# Altium PCB Slave.PcbDoc
Units mm, origin at the board's own origin, x right, y up, seen from the top; angles counter-clockwise.
Board outline 50.37 x 67.75 mm, 2 copper layers (Top Layer, Bottom Layer); 18 components, 16 nets, 92 pads, 0 vias.
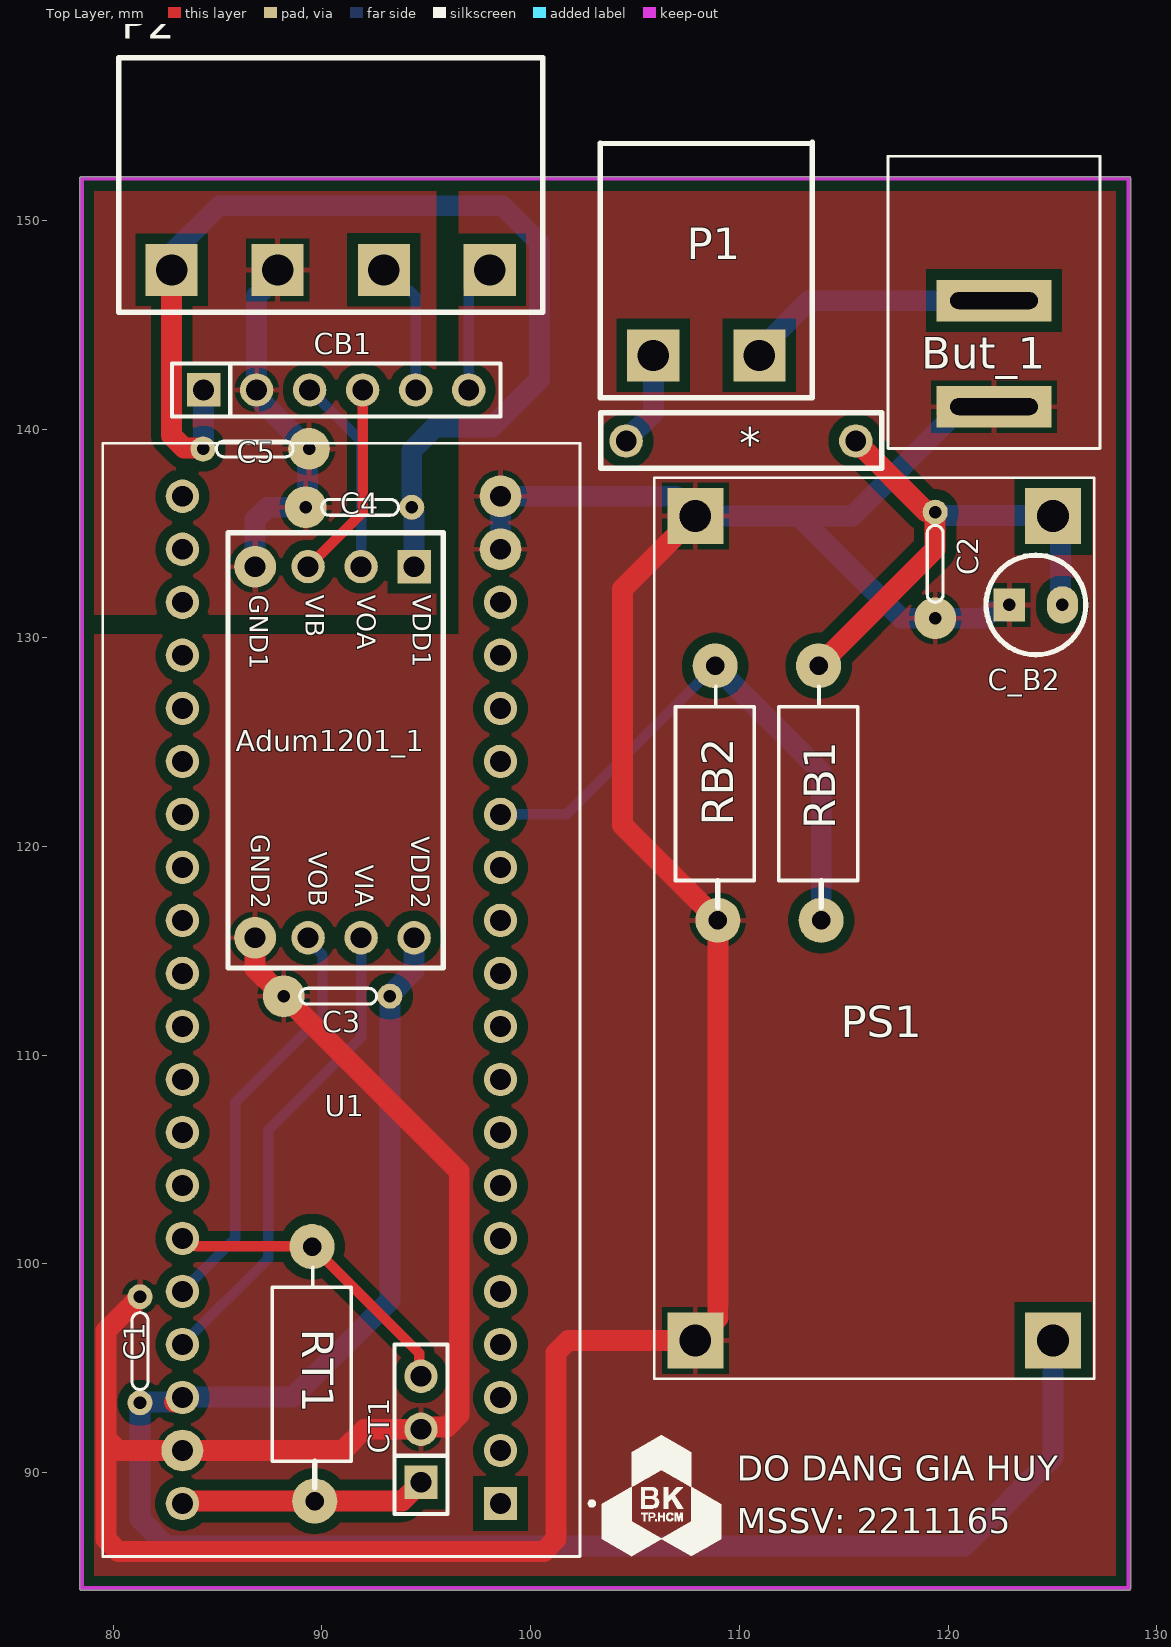
[diagram p0: Top Layer view]
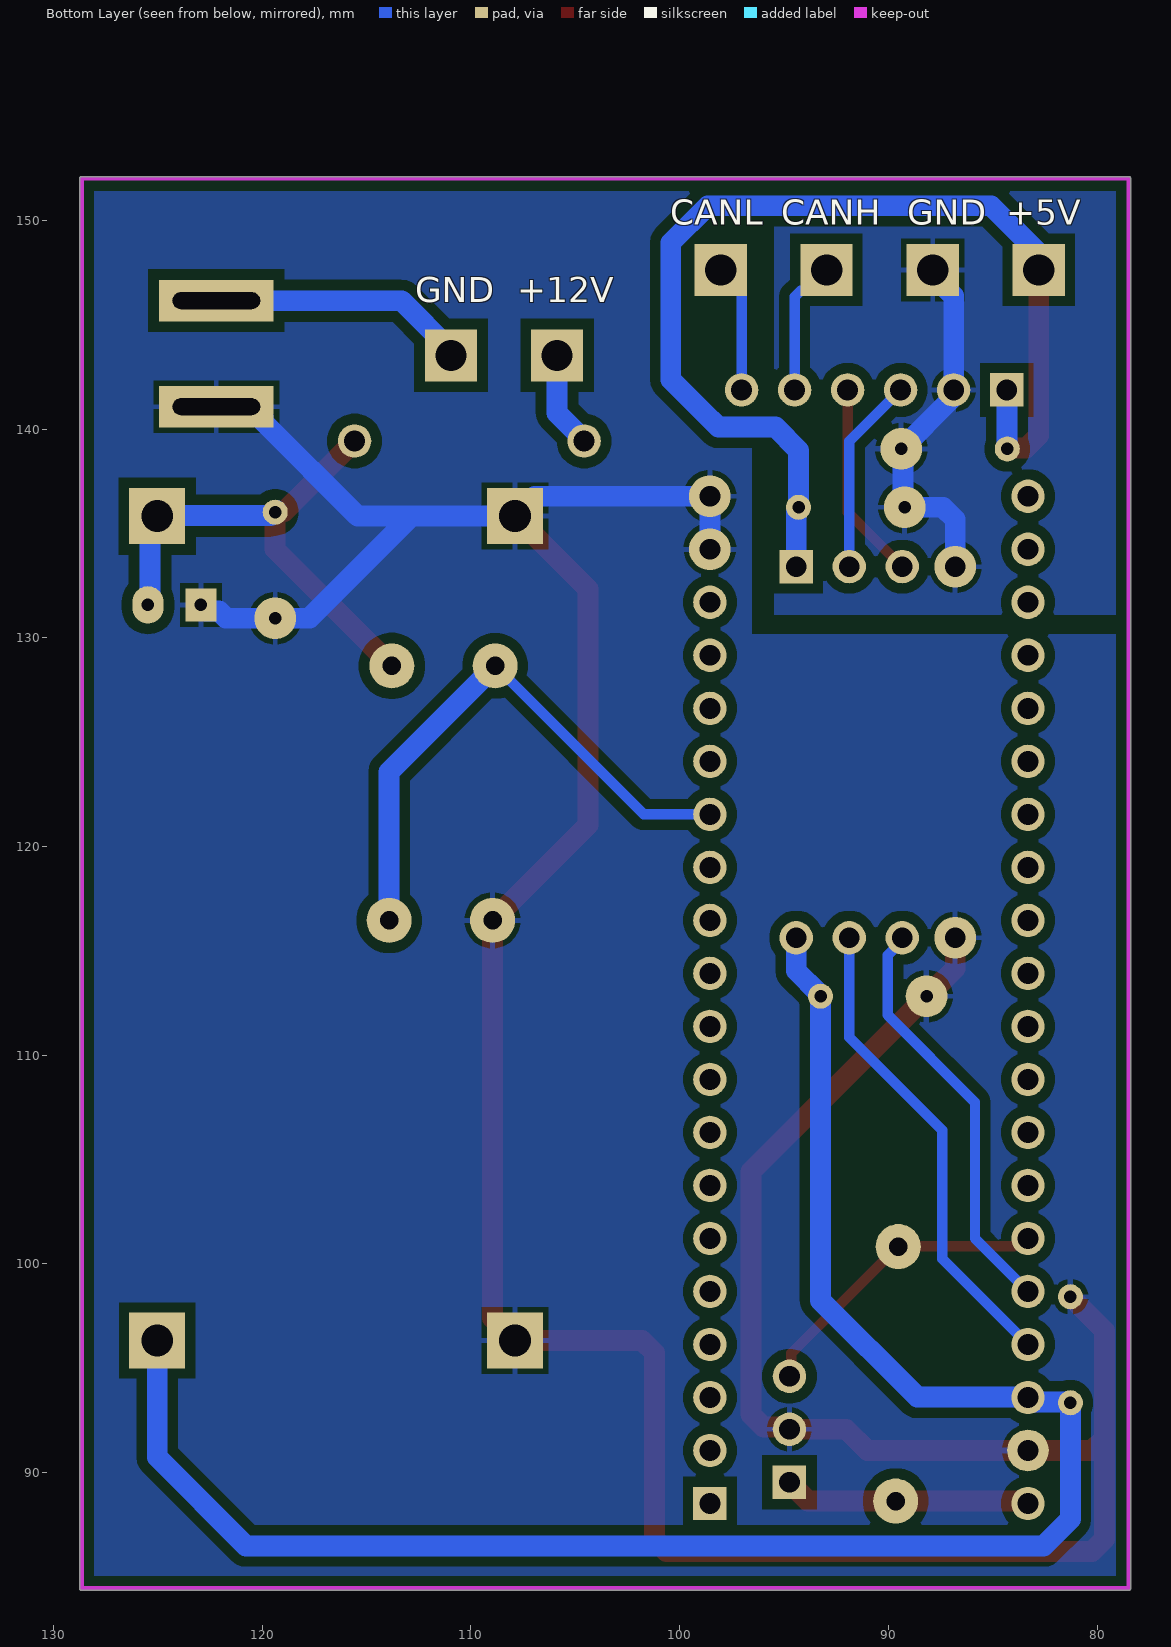
[diagram p1: Bottom Layer view, seen from below]

## Layer stack, top to bottom
Top Solder: solder mask 0.0102, Solder Resist, Dk 3.5
Top Layer: signal copper 0.0356
Dielectric 1: dielectric 0.32, FR-4, Dk 4.8
Bottom Layer: signal copper 0.0356
Bottom Solder: solder mask 0.0102, Solder Resist, Dk 3.5

## Board outline
78.386,84.455 78.386,152 cw(c78.486,152) 78.486,152.1 128.651,152.1 cw(c128.651,152) 128.751,152 128.751,84.455 cw(c128.651,84.455) 128.651,84.355 78.486,84.355 cw(c78.486,84.455)

## Design rules (kind name [scope] priority, off if disabled: settings)
Clearance Clearance_Polygon [InPolygon] p1: gap=0.5 ignorepadtopadclearanceinfootprint=FALSE
Clearance [All] p2: gap=0.3 ignorepadtopadclearanceinfootprint=FALSE
ComponentClearance [All] p1: gap=0 collisioncheckmode=3 verticalgap=0 showdistances=FALSE
PlaneClearance [All] p1: clearance=0.5
PlaneConnect [All] p1: planeconnectstyle=Direct reliefexpansion=0.508 reliefentries=4 reliefconductorwidth=0.254 reliefairgap=0.254
PolygonConnect [All] p1: connectstyle=Relief reliefconductorwidth=0.254 reliefentries=4 polygonreliefangle="90 Angle" airgapwidth=0.254
RoutingVias [All] p1: holewidth=0.711 width=1.27 viastyle="Through Hole" minholewidth=0.711 minwidth=1.27 maxholewidth=0.711 maxwidth=1.27
SolderMaskExpansion [All] p1: expansion=0.102 istentingtop=FALSE
Width power [InNetClass('Pwer')] p1: maxlimit=1.5 minlimit=0.5 preferedwidth=1
Width [All] p2: maxlimit=1 minlimit=0.3 preferedwidth=0.5
27 further rules are at their usual default settings.

## Components (designator, comment, footprint, x,y, rotation, side; value= is the part's Value field where it differs from the comment)
* "Component_1" fuse 104.575,139.425 r0 top
Adum1201_1 "Adum1201_1" Adum1201 94.415,133.405 r270 top (schematic designator *1)
But_1 "Button" Button 122.2,141.07 r180 top
C1 "Capacitor Ceramic" Tu-ceramic#1 81.28,93.345 r90 top value=100nF
C2 "Capacitor Ceramic" Tu-ceramic#2 119.38,136.017 r270 top value=100nF
C3 "Capacitor Ceramic" Tu-ceramic#2 93.25,112.825 r180 top value=100nF
C4 "Capacitor Ceramic" Tu-ceramic#2 94.3,136.25 r180 top value=100nF
C5 "Capacitor Ceramic" Tu-ceramic#2 84.3,139.05 r0 top value=100nF
C_B2 "22 mF - 100mF" CA-ALU-2.54 124.206,131.572 r0 top value=104
CB1 "JP6" JP6-C1T 84.33,141.875 r0 top
CT1 "JP3" JP3-C1T 94.742,89.535 r90 top
P1 "BIG_Header 1" "BIG_Header 2" 105.875,143.525 r0 top
P2 "BIG Header 4" "BIG_Header 4" 82.795,147.625 r0 top
PS1 "MC00100" CONV_MC00100 116.459,116.078 r270 top
RB1 "33k" RES-1/2W 113.792,122.047 r90 top
RB2 "9.1k" RES-1/2W 108.839,122.047 r90 top
RT1 "4K7" RES-1/2W 89.525,94.225 r90 top
U1 "ZC323000" MODULE_ZC323000 90.932,112.649 r180 top

## Footprints (in the part's own frame and the unit in brackets; to place one, negate y for a bottom-side part, rotate by r counter-clockwise, add the part's x,y. Pads: shape width x height; smd on the part's side, far side on the other; paste and mask are expansions set on the pad)
Adum1201 [mm]
  rect 1.6x1.6 hole 1: 1(0,0)
  round 1.6 hole 1: 2(0,-2.54) 3(0,-5.08) 5(17.78,0) 6(17.78,-2.54) 7(17.78,-5.08)
  round 2 hole 1: 4(0,-7.62) 8(17.78,-7.62)
  silkscreen extent -1.63,-8.92 19.23,1.4
"BIG_Header 2" [mm]
  rect 2.5x2.5 hole 1.5: 1(0,0) 2(5.08,0)
  silkscreen extent -2.54,-2.03 7.62,10.21, body extent -2.5,-1.75 7.58,10.25, height 3.15
"BIG_Header 4" [mm]
  rect 2.5x2.5 hole 1.5: 1(0,0) 2(5.08,0) 3(10.173,0) 4(15.24,0)
  rect 2x2.5 hole 1.5: 1(0,0) 2(5.08,0) 3(10.16,0)
  silkscreen extent -2.54,-2.03 17.78,10.17, body extent -2.5,-1.75 17.74,10.25, height 3.15
Button [mm]
  rect 5.5x2 hole 0.8 slot 4.2 at 0 deg: 1(0,0) 2(0,-5.08)
  silkscreen extent -5.08,-12 5.08,2
CA-ALU-2.54 [mm]
  rect 1.5x1.58 hole 0.6: 1(-1.27,0)
  oval 1.5x1.8 hole 0.6: 2(1.27,0)
  silkscreen extent -2.39,-2.39 2.39,2.39, body extent -2,-2.03 1.99,1.97, height 7.01
CONV_MC00100 [mil]
  rect 105.63x105.63 / inner round 105.63 / far side rect 105.63x105.63 hole 60 mask+4.02: IN+(-777.5,337.5) IN-(-777.5,-337.5) OUT+(777.5,337.5) OUT-(777.5,-337.5)
  silkscreen extent -850,-415 850,415, body extent -850,-415 850,415, height 551
fuse [mm]
  round 1.6 hole 1: 1(0,0) 2(11,0)
  silkscreen extent -1.22,-1.3 12.25,1.35
JP3-C1T [mm] "3 row, straight, gold plating"
  rect 1.6x1.6 hole 1: 1(0,0)
  round 1.6 hole 1: 2(2.54,0) 3(5.08,0)
  silkscreen extent -1.52,-1.27 6.6,1.27, body extent -1.52,-1.25 6.6,1.25, height 8.51
JP6-C1T [mm] "6 row, straight, gold plating"
  rect 1.6x1.6 hole 1: 1(0,0)
  round 1.6 hole 1: 2(2.54,0) 3(5.08,0) 4(7.62,0) 5(10.16,0) 6(12.7,0)
  silkscreen extent -1.52,-1.27 14.22,1.27, body extent -1.52,-1.25 14.22,1.25, height 8.51
MODULE_ZC323000 [mm]
  rect 1.6x1.6 hole 1: 1(-7.62,24.13)
  round 1.6 hole 1: 2(-7.62,21.59) 3(-7.62,19.05) 4(-7.62,16.51) 5(-7.62,13.97) 6(-7.62,11.43) 7(-7.62,8.89) 8(-7.62,6.35) 9(-7.62,3.81) 10(-7.62,1.27) 11(-7.62,-1.27) 12(-7.62,-3.81) 13(-7.62,-6.35) 14(-7.62,-8.89) 15(-7.62,-11.43) 16(-7.62,-13.97) 17(-7.62,-16.51) 18(-7.62,-19.05) 21(7.62,-24.13) 22(7.62,-21.59) 23(7.62,-19.05) 24(7.62,-16.51) 25(7.62,-13.97) 26(7.62,-11.43) 27(7.62,-8.89) 28(7.62,-6.35) 29(7.62,-3.81) 30(7.62,-1.27) 31(7.62,1.27) 32(7.62,3.81) 33(7.62,6.35) 34(7.62,8.89) 35(7.62,11.43) 36(7.62,13.97) 37(7.62,16.51) 38(7.62,19.05) 40(7.62,24.13)
  round 2 hole 1: 19(-7.62,-21.59) 20(-7.62,-24.13) 39(7.62,21.59)
  silkscreen extent -12.1,-26.67 11.43,26.67
RES-1/2W [mil]
  round 85 hole 35: 1(-220,-5) 2(260,0)
  silkscreen extent -195,-74 221,75, body extent -230,-60 270,56, height 121
Tu-ceramic#1 [mm] "Tu gom mini"
  round 1.2 hole 0.6: 1(0,0) 2(5.08,0)
  silkscreen extent 0.64,-0.38 4.32,0.38, body extent -0.38,-0.85 5.46,0.85, height 6.12
Tu-ceramic#2 [mm] "Tu gom mini"
  round 1.2 hole 0.6: 1(0,0)
  round 2 hole 0.6: 2(5.08,0)
  silkscreen extent 0.64,-0.38 4.32,0.38, body extent -0.38,-0.85 5.46,0.85, height 6.12

## Part data
Adum1201_1: library part Adum1201_?
C1 C2 C3 C4 C5: library part CapDecop, "Capacitor", LatestRevisionDate=17-Jul-2002, LatestRevisionNote="Re-released for DXP Platform.", PackageReference=RAD-0.3, Published=8-Jun-2000, Publisher="Altium Limited"
C_B2: library part CN-ALU-DIP, "Capacitor (Semiconductor SIM Model)", LatestRevisionDate=17-Jul-2002, LatestRevisionNote="Re-released for DXP Platform.", PackageReference=C1206, Publisher="Altium Limited"
CB1: "WR-PHD 2.54 mm Angled Socket Header", Manufacturer="W¨¹rth Elektronik eiSos GmbH", partNo=613006143121, ComponentLink1 Description=Manufacturer, ComponentLink1URL=http://www.we-online.com, ComponentLink2 Description=Datasheet, ComponentLink2URL=http://katalog.we-online.de/em/datasheet/6130xx143121.pdf, Created by="Karrer Zheng", Created Date="29 March 2013", NoPins=06
CT1: "WR-PHD 2.54 mm Angled Socket Header", Manufacturer="W¨¹rth Elektronik eiSos GmbH", partNo=613003143121, ComponentLink1 Description=Manufacturer, ComponentLink1URL=http://www.we-online.com, ComponentLink2 Description=Datasheet, ComponentLink2URL=http://katalog.we-online.de/em/datasheet/6130xx143121.pdf, Created by="Karrer Zheng", Created Date="29 March 2013", NoPins=03
P1: library part "BIG_Header 2"
P2: library part "BIG_Header 4"
PS1: "DC-DC LM2596 Step Down Adjustable Converter Power Supply Module 1.3V-35V", Package=None, Check_prices=https://www.snapeda.com/parts/MC00100/YKS/view-part/?ref=eda, MF=YKS, MP=MC00100, SnapEDA_Link=https://www.snapeda.com/parts/MC00100/YKS/view-part/?ref=snap
RB1 RB2 RT1: library part Res, "Res", Manufacturer="Generic Components", Class=Passive, Published=08/06/2000, Publisher="Altium Hobart Technology Centre", SubClass=R
U1: "STM32F103C8T6 ARM STM32 Minimum System Development Board Module For Arduino", Package=None, Availability=Unavailable, MP=ZC323000, Price=None

## Nets (pads, with @x,y where several pads share a name; then routed paths per layer and width w, separated by ;. In a path a pad name is that pad's centre, name@x,y a point inside that pad or via, vN(x,y) a via of type N, cw(c..) or ccw(c..) an arc to the next point about the centre after c; other vN are vias at no path point)
5V_Power: Adum1201_1.1 C4.1 C5.1 CB1.1 P2.1 | length 51.8
  Top Layer w1: P2.1@82.795,147.823 82.795,139.686 83.393,139.088 84.262,139.088 C5.1 ; C4.1@94.3,136.196 C4.1
  Bottom Layer w1: P2.1@82.827,148.452 85.075,150.7 98.65,150.7 100.425,148.925 100.425,142.375 98.894,140.844 98.139,140.089 95.412,140.089 94.3,138.977 94.3,136.196 94.415,136.081 Adum1201_1.1 ; C5.1 84.315,139.065 84.315,141.86 CB1.1
+5: Adum1201_1.5 C1.1 C3.1 PS1.OUT+ U1.38 | length 89
  Top Layer w1: C1.1 C1.1@81.318,93.383 ; U1.38@82.934,93.383 83.15,93.599 U1.38
  Bottom Layer w1: C1.1 81.28,87.77 82.563,86.487 120.777,86.487 125.031,90.742 PS1.OUT+ ; C1.1@81.318,93.383 U1.38@82.934,93.383 ; U1.38 83.326,93.613 88.613,93.613 93.25,98.25 C3.1@93.25,112.771 ; C3.1@93.25,112.879 93.35,112.979 94.415,114.044 Adum1201_1.5
+12: *.2 C2.1 C_B2.2 PS1.IN+ RB1.2 | length 25.2
  Top Layer w1: RB1.2 119.38,134.239 C2.1 119.342,136.055 118.945,136.055 *.2
  Bottom Layer w1: C2.1@119.348,135.946 C2.1@119.348,136.103 ; C2.1 119.434,136.017 119.601,135.85 PS1.IN+@125.008,135.85 ; PS1.IN+ 125.38,135.478 125.38,131.668 C_B2.2
CANH: CB1.5 P2.3 | length 6.5
  Bottom Layer w0.5: P2.3@92.968,147.625 93.968,146.625 94.197,146.625 94.49,146.332 CB1.5
CANL: CB1.6 P2.4 | length 6.2
  Bottom Layer w0.5: CB1.6 97.03,146.332 97.035,146.337 97.035,146.625 P2.4@98.039,147.629
GND: Adum1201_1.8 But_1.1 C1.2 C2.2 C3.2 C_B2.1 CT1.2 PS1.IN- PS1.OUT- RB2.1 U1.19 U1.20 U1.39 | length 179.1
  Top Layer w1: C1.2 79.65,96.795 79.65,91.645 ; Adum1201_1.8 86.795,114.155 C3.2@87.81,113.14 ; C3.2 96.575,104.42 96.575,92.776 95.989,92.19 94.857,92.19 CT1.2 92.025,92.075 91.009,91.059 U1.39 80.236,91.059 79.65,91.645 ; PS1.IN- 104.394,132.334 104.394,121.031 RB2.1 108.966,97.409 PS1.OUT- 101.8,96.329 101.214,95.744 101.214,86.811 100.628,86.225 80.236,86.225 79.65,86.811 79.65,91.645
  Bottom Layer w1: U1.19 U1.20 106.934,136.779 PS1.IN- 112.84,135.826 ; But_1.1 120.45,141.07 119.95,140.57 119.95,140.35 115.427,135.826 112.84,135.826 ; C_B2.1 122.936,131.532 122.686,131.282 122.075,131.282 121.73,130.937 C2.2 117.729,130.937 112.84,135.826
GND_Power: Adum1201_1.4 C4.2 C5.2 CB1.2 P2.2 | length 17.8
  Bottom Layer w1: Adum1201_1.4 86.795,135.664 87.381,136.25 C4.2 89.3,136.33 89.3,138.97 C5.2 86.985,141.445 86.985,141.76 CB1.2 86.87,146.37 87.875,147.375 P2.2@87.875,147.625
Net*_1: *.1 P1.1 | length 4.6
  Bottom Layer w1: *.1 104.575,139.475 105.875,140.775 P1.1
NetBut_1_2: But_1.2 P1.2 | length 12.5
  Bottom Layer w1: P1.2 110.955,143.775 113.33,146.15 But_1.2
NetCT1_1: CT1.1 RT1.1 U1.40 | length 11.9
  Top Layer w1: U1.40 83.427,88.634 83.851,88.634 83.854,88.637 93.844,88.637 CT1.1
NetCT1_3: CT1.3 RT1.2 U1.35 | length 14.9
  Top Layer w0.5: U1.35 83.61,101.219 83.99,100.839 89.534,100.839 94.654,95.719 94.654,94.703 CT1.3
  Bottom Layer w0.3: U1.35 U1.35@83.376,101.282
Rx_I: Adum1201_1.7 U1.36 | length 20
  Bottom Layer w0.5: U1.36 85.85,101.217 85.85,107.75 90.025,111.925 90.025,114.782 89.335,115.472 Adum1201_1.7
Rx_O: Adum1201_1.3 CB1.4 | length 9.6
  Top Layer w0.5: Adum1201_1.3 91.95,136.02 CB1.4
Tx_I: Adum1201_1.6 U1.37 | length 23
  Bottom Layer w0.5: U1.37 87.425,100.252 87.425,106.4 91.875,110.85 Adum1201_1.6
Tx_O: Adum1201_1.2 CB1.3 | length 9.5
  Bottom Layer w0.5: CB1.3 91.875,139.41 Adum1201_1.2
U_BAT4: RB1.1 RB2.2 U1.14 | length 27.5
  Bottom Layer w0.5: U1.14 101.727,121.539 RB2.2
  Bottom Layer w1: RB2.2 113.919,123.571 RB1.1
pads on no net: U1.1 U1.2 U1.3 U1.4 U1.5 U1.6 U1.7 U1.8 U1.9 U1.10 U1.11 U1.12 U1.13 U1.15 U1.16 U1.17 U1.18 U1.21 U1.22 U1.23 U1.24 U1.25 U1.26 U1.27 U1.28 U1.29 U1.30 U1.31 U1.32 U1.33 U1.34

## Polygon pours and split planes (outlines as drawn)
GND_Power on Bottom Layer "GND_POWER_L02_P003" (solid, remove dead copper, pour order 3): 95.475,152 78.5,152 78.5,131.1 95.475,131.1
GND on Bottom Layer "GND_L02_P000" (solid, remove dead copper, pour order 0): 128.65,152.025 96.55,152.025 96.55,130.175 80.325,130.175 78.486,130.175 78.486,84.45 128.65,84.45
GND_Power on Top Layer "GND_POWER_L01_P002" (solid, remove dead copper, pour order 2): 78.475,152 78.475,131.1 95.475,131.1 95.475,152 78.525,152
GND on Top Layer "GND_L01_P001" (solid, remove dead copper, pour order 1): 128.625,151.975 128.625,84.45 128.6,84.475 78.475,84.475 78.475,130.15 78.5,130.175 96.55,130.175 96.55,152.025 96.6,151.975

## Keep-outs
Keep-Out Layer:
  lines w0.2: 78.486,84.455 128.651,84.455 128.651,152 78.486,152 78.486,84.455

## Silkscreen, mask and mechanical layers (free items; w line width, h text height)
Top Overlay:
  drawing of 9 lines, arcs and shapes, not listed
  text "DO DANG GIA HUY" at 109.875,89.6 h1.2
  text "MSSV: 2211165" at 109.875,87.1 h1.2
Bottom Overlay:
  text "+5V" at 84.35,149.8 h1.2
  text "GND" at 89.1,149.8 h1.2
  text "CANH" at 95.125,149.8 h1.2
  text "CANL" at 100.45,149.8 h1.2
  text "+12V" at 107.775,146.075 h1.2
  text "GND" at 112.675,146.075 h1.2

## Text inside footprints (layer, text, board x,y; h text height)
Adum1201_1: Top Overlay "GND2" at 86.303,120.578 h1.52 r270; Top Overlay "VOB" at 89.047,119.737 h1.52 r270; Top Overlay "VIA" at 91.291,119.129 h1.52 r270; Top Overlay "GND1" at 86.227,132.059 h1.52 r270; Top Overlay "VDD1" at 94.034,132.057 h1.52 r270; Top Overlay "VDD2" at 93.958,120.495 h1.52 r270; Top Overlay "VOA" at 91.383,132.057 h1.52 r270; Top Overlay "VIB" at 88.903,132.057 h1.52 r270
PS1: Mechanical 13 "IN+" at 121.959,137.078 h1.27 r270; Mechanical 13 "IN-" at 109.709,137.078 h1.27 r270; Mechanical 13 "OUT-" at 109.709,99.078 h1.27 r270; Mechanical 13 "OUT+" at 121.959,99.578 h1.27 r270